# Altium PCB Stepper-Driver-v2.0.PcbDoc (part 6 of 7)
Units mil, origin at the board's own origin, x right, y up, seen from the top; angles counter-clockwise.
Board outline 5905.51 x 4330.71 mil, 4 copper layers (Top Layer, Layer 1, Layer 2, Bottom Layer), stack 62.047 mil thick; 312 components, 285 nets, 1093 pads, 969 vias.
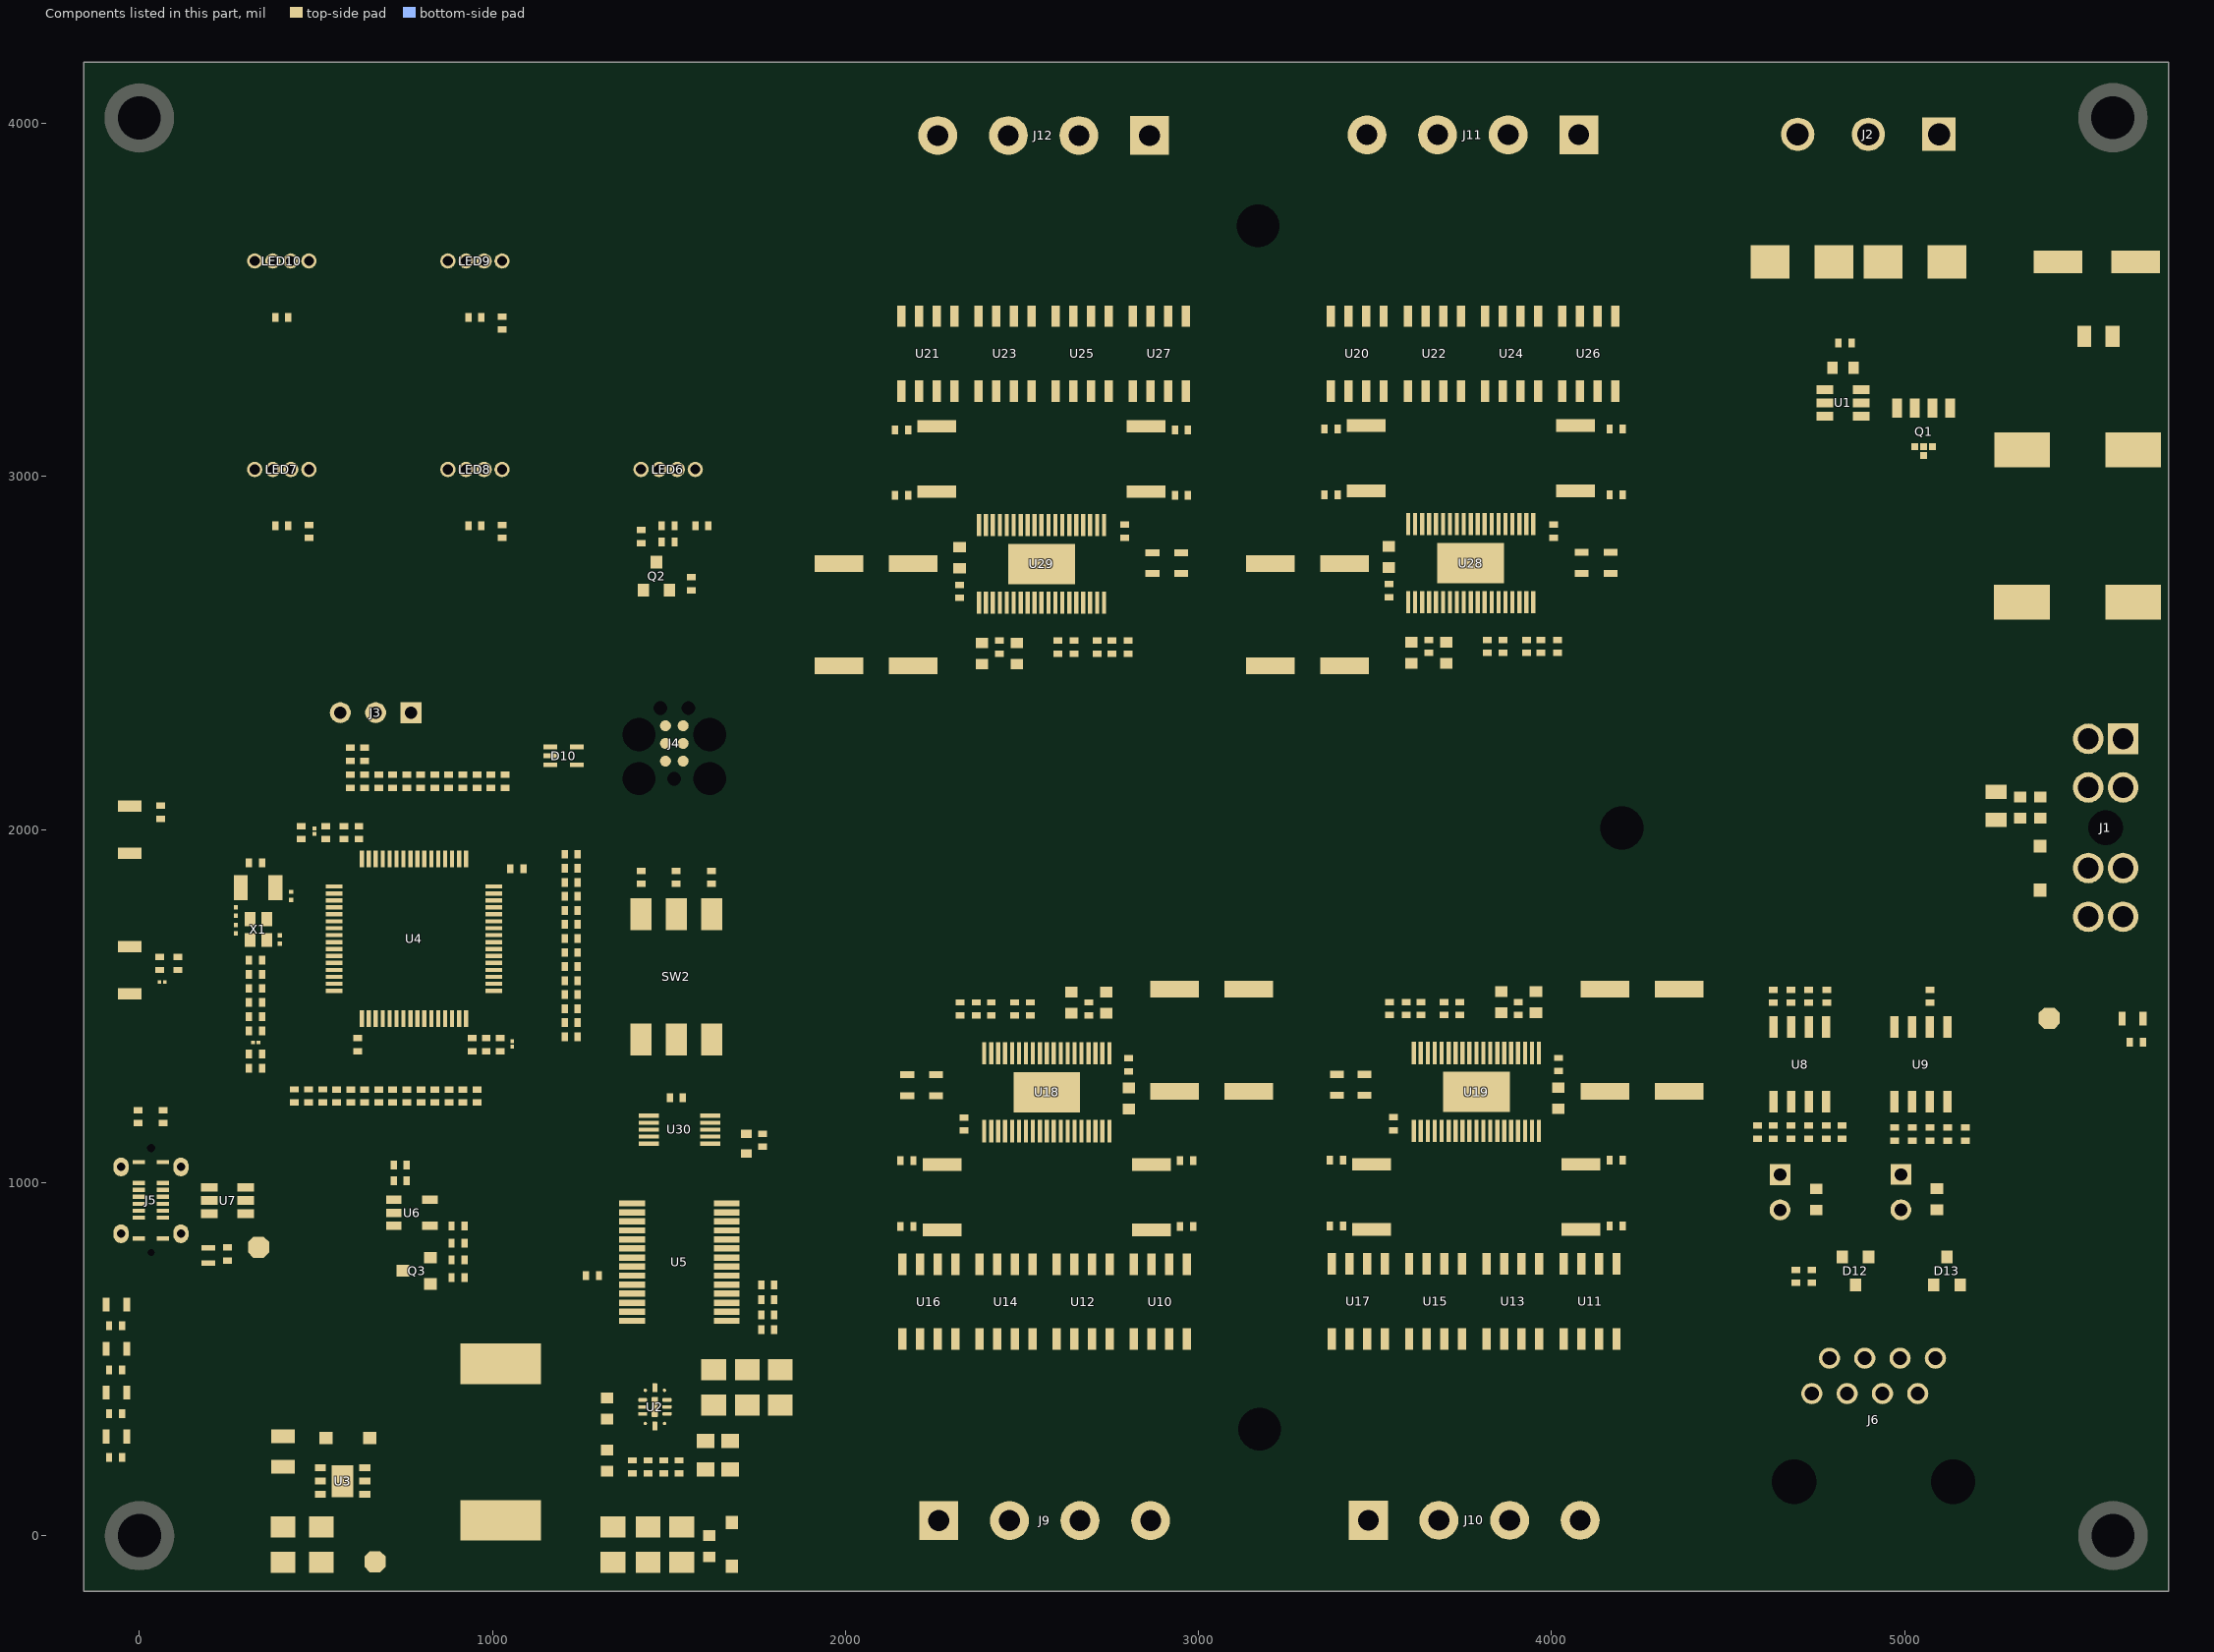
[diagram p6: the components of this part, seen from the top]

## Polygon pours and split planes (outlines as drawn) (continued)
BOUT1-4 on Top Layer "NONET_L-01_P-001" (solid, remove dead copper, pour order 67): 2623.54,3120.95 2578.36,3075.77 2578.36,2862.77 2565.69,2862.77 2565.69,3398.82 2677.5,3398.82 2677.5,3592.01 2573.56,3592.01 2573.56,4143.34 2748.9,4143.34 2748.9,3809.57 2768.35,3790.12 2768.35,3293.44 2623.54,3293.44
24V on Top Layer "24V_L01_P118" (solid, pour order 118): 3336.33,2806.39 3090.29,2806.39 3071.8,2824.87 3071.8,3394.13 3051.74,3414.19 2899.98,3414.19 2899.98,3568.53 3440.12,3568.53 3440.12,3421.14 3290.58,3421.14 3265.86,3396.43 3265.86,2919.18 3307.36,2877.68 3556.36,2877.68 3556.36,2768.24 3500.96,2768.24 3490.86,2758.14 3490.86,2600.77 3503.01,2588.62 3638.18,2588.62 3647.78,2598.21 3647.78,2640.07 3657.77,2640.07 3657.77,2584.73 3626.68,2553.64 3626.68,2511.41 3502.38,2511.41 3490.86,2499.88 3490.86,2410.07 3336.33,2410.07
AOUT1-3 on Top Layer "NONET_L-01_P-001" (solid, remove dead copper, pour order 14): 3286.39,3385.19 3301.67,3400.48 3460.45,3400.48 3460.45,3589.84 3286.39,3589.84 3286.39,4145.49 3569.43,4145.49 3569.43,3824.63 3549.09,3804.29 3549.09,3292.52 3391.93,3292.52 3391.93,3207.35 3308.39,3207.35 3308.39,2943.4 3336.64,2915.14 3617.19,2915.14 3617.19,2864.92 3609.63,2864.92 3609.63,2901.62 3322.66,2901.62 3286.39,2937.9
24V on Top Layer "24V_L01_P117" (solid, pour order 117): 4465.19,440.92 4486.17,461.91 4486.17,1182.19 4475.76,1192.6 4221.39,1192.6 4221.39,1572.24 4066.86,1572.24 4066.86,1507.43 4055.34,1495.9 3931.04,1495.9 3931.04,1458.77 3899.95,1427.68 3899.95,1367.24 3909.94,1367.24 3909.94,1409.1 3919.48,1418.64 3957.15,1418.69 4054.71,1418.69 4066.86,1406.54 4066.86,1249.17 4056.75,1239.07 4001.35,1239.07 4001.35,1131.24 4248.74,1131.24 4292.33,1087.66 4292.33,624.07 4263.87,595.61 4117.6,595.61 4117.6,440.92
BOUT2-2 on Top Layer "NONET_L-01_P-001" (solid, remove dead copper, pour order 38): 3290.35,624.05 3298.35,616.05 3464.28,616.05 3464.28,419.62 3290.35,419.62 3290.35,-133.8 3573.39,-133.8 3573.39,187.06 3553.05,207.4 3553.05,719.17 3455.56,719.17 3455.56,804.34 3399.73,804.34 3399.73,729.56 3355.71,729.56 3355.71,804.34 3312.35,804.34 3312.35,1068.29 3340.26,1096.21 3633.11,1096.21 3633.11,1146.77 3625.51,1146.77 3625.51,1110.07 3326.62,1110.07 3290.35,1073.79
AOUT1-1 on Top Layer "NONET_L-01_P-001" (solid, remove dead copper, pour order 41): 3043.07,615.06 3054.49,626.47 3054.49,1072.93 3018.91,1108.51 2731.25,1108.51 2731.25,1145.91 2723.69,1145.91 2723.69,1095.29 3004.64,1095.29 3032.49,1067.43 3032.49,804.23 2939.1,804.23 2939.1,718.79 2791.79,718.79 2791.79,206.54 2771.45,186.2 2771.45,-134.66 3054.49,-134.66 3054.49,418.64 2880,418.64 2880,615.06
AOUT1-2 on Top Layer "NONET_L-01_P-001" (solid, remove dead copper, pour order 23): 4254.2,616.08 4271.33,633.21 4271.33,1073.79 4235.06,1110.07 3948.09,1110.07 3948.09,1146.77 3940.53,1146.77 3940.53,1095.89 4221.73,1095.89 4249.33,1068.29 4249.33,804.34 4155.94,804.34 4155.94,719.17 4008.63,719.17 4008.63,207.4 3988.29,187.06 3988.29,-133.8 4271.33,-133.8 4271.33,420.07 4097.05,420.07 4097.05,616.08
GND on Top Layer "GND_L01_P125" (solid, remove dead copper, pour order 125): -137.67,-133.8 -137.67,4145.49 5728.95,4145.49 5728.95,-133.8
NetC9_1 on Top Layer "NETC9_1_L01_P103" (solid, pour order 103): 882.33,533.62 898.77,550.07 1454.3,550.07 1470.2,534.16 1470.2,406.2 1449.34,406.2 1449.34,470.05 1448.94,470.46 1341.69,470.46 1341.69,370.94 1341.69,358.68 903.71,358.68 882.33,380.07
AGND on Top Layer "AGND_L01_P121" (solid, pour order 121): 588.16,1630.92 584.54,1627.3 550.83,1627.3 550.83,1617.32 619.3,1617.32 626.57,1624.6 626.57,1717.78 623.66,1720.69 590.98,1720.69 588.16,1717.87
AGND on Top Layer "AGND_L01_P120" (solid, pour order 120): 319.25,1336.66 272.26,1336.66 272.26,1392.04 323.11,1392.04 323.11,1482.72 241.13,1482.72 233.83,1475.42 233.83,1317.97 240.14,1311.66 319.25,1311.66
24V on Top Layer "24V_L01_P119" (solid, pour order 119): 1879.64,3569.48 1855.56,3545.4 1855.56,2825.13 1874.3,2806.39 2120.35,2806.39 2120.35,2420.07 2274.87,2420.07 2274.87,2499.88 2286.4,2511.41 2410.7,2511.41 2410.7,2552.12 2441.78,2583.2 2441.78,2640.07 2431.8,2640.07 2431.8,2598.21 2423,2589.42 2286.23,2589.42 2274.87,2600.77 2274.87,2758.14 2284.98,2768.24 2340.38,2768.24 2340.38,2877.68 2098.71,2877.68 2049.33,2927.07 2049.33,3391.75 2071.52,3413.94 2224.14,3413.94 2224.14,3569.48
5V on Top Layer "5V_L01_P107" (solid, pour order 107): 882.33,-0.93 895.5,-14.11 1694.01,-14.11 1707.58,-0.54 1707.58,125.16 1694.54,138.2 897.47,138.2 882.33,123.07
GND on Top Layer "GND_L01_P105" (solid, pour order 105): 1398.93,277.31 1398.93,301.63 1372.94,301.63 1372.94,236.12 1470.19,236.12 1470.19,393.4 1449.23,393.4 1449.23,277.31
AOUT2-3 on Top Layer "NONET_L-01_P-001" (solid, remove dead copper, pour order 95): 3757.76,3400.48 3757.76,3292.08 3720.61,3292.08 3720.61,3195.14 3760.69,3195.14 3760.69,2833.42 3747.44,2833.42 3747.44,3077.44 3664.48,3160.4 3664.48,3292.52 3569.43,3292.52 3569.43,3792.26 3589.8,3812.64 3589.8,4145.49 3764.22,4145.49 3764.22,3592.01 3660.05,3592.01 3660.05,3400.48
GND_B-3 on Top Layer "GND_B-3_L01_P094" (solid, pour order 94): 4186.96,3182.07 4186.96,3080.98 3883.71,3080.98 3883.71,3272.13 3929.53,3272.13 3929.53,3182.07 3994,3182.07 3994,3272.13 4047.31,3272.13 4047.31,3182.07
GND_A-3 on Top Layer "GND_A-3_L01_P093" (solid, pour order 93): 3371.63,3182.07 3371.63,3080.98 3620.28,3080.98 3620.28,3272.13 3555.79,3272.13 3555.79,3182.07 3491.84,3182.07 3491.84,3272.13 3455.92,3272.13 3455.92,3182.07
AOUT1-4 on Top Layer "NONET_L-01_P-001" (solid, remove dead copper, pour order 68): 2070.41,3383.6 2080.24,3393.43 2245.19,3393.43 2245.19,3590.07 2070.41,3590.07 2070.41,4143.34 2353.45,4143.34 2353.45,3822.49 2333.11,3802.15 2333.11,3293.44 2185.8,3293.44 2185.8,3205.21 2092.41,3205.21 2092.41,2941.25 2120.65,2913.01 2401.2,2913.01 2401.2,2862.77 2393.65,2862.77 2393.65,2899.48 2106.68,2899.48 2070.41,2935.75
AOUT2-4 on Top Layer "NONET_L-01_P-001" (solid, remove dead copper, pour order 66): 2541.78,3398.34 2541.78,3283.7 2504.63,3283.7 2504.63,3193 2545.07,3193 2545.07,2831.28 2531.46,2831.28 2531.46,3075.29 2448.5,3158.26 2448.5,3293.44 2353.45,3293.44 2353.45,3790.12 2372.9,3809.57 2372.9,4143.34 2548.23,4143.34 2548.23,3592.01 2444.21,3592.01 2444.21,3398.34
GND_B-4 on Top Layer "GND_B-4_L01_P065" (solid, pour order 65): 2951.31,3179.07 2951.31,3078.84 2667.73,3078.84 2667.73,3272.13 2723.47,3272.13 2723.47,3200.72 2767.26,3200.72 2767.26,3272.13 2842.13,3272.13 2842.13,3179.07
GND_A-4 on Top Layer "GND_A-4_L01_P064" (solid, pour order 64): 2155.64,3179.07 2155.64,3078.84 2404.3,3078.84 2404.3,3272.33 2329.92,3272.33 2329.92,3200.72 2286.1,3200.72 2286.1,3272.33 2229.9,3272.33 2229.9,3179.07
NetC3_1 on Top Layer "NETC3_1_L01_P063" (solid, pour order 63): 5013.52,3242.07 4919.33,3242.07 4919.33,3524.07 5033.46,3524.07 5033.46,4145.49 5728.95,4145.49 5728.95,3144.84 5013.52,3144.84
VIN on Top Layer "VIN_L01_P048" (solid, pour order 48): 4944.78,3124.84 4944.78,3183.33 4840.21,3183.33 4840.21,2069.6 5728.95,2069.6 5728.95,3124.84
24V on Top Layer "24V_L01_P047" (solid, pour order 47): 3004.54,1200.07 3250.59,1200.07 3269.33,1181.33 3269.33,616.14 3289.86,595.6 3443.85,595.6 3443.85,440.07 2901.62,440.07 2900.76,439.21 2900.76,594.75 3051.74,594.75 3077.33,620.33 3077.33,1084.96 3033.52,1128.77 2784.51,1128.77 2784.51,1238.21 2839.91,1238.21 2850.02,1248.31 2850.02,1405.68 2837.87,1417.83 2740.31,1417.83 2702.64,1417.78 2693.1,1408.24 2693.1,1366.39 2683.11,1366.39 2683.11,1426.82 2714.2,1457.91 2714.2,1495.04 2838.49,1495.04 2850.02,1506.57 2850.02,1571.38 3004.54,1571.38
BOUT2-1 on Top Layer "NONET_L-01_P-001" (solid, remove dead copper, pour order 42): 2138.87,803.48 2138.87,728.7 2182.89,728.7 2182.89,803.48 2238.72,803.48 2238.72,718.34 2336.2,718.34 2336.2,206.54 2356.55,186.2 2356.55,-134.66 2073.5,-134.66 2073.5,418.37 2247.39,418.37 2247.39,615.2 2073.5,615.2 2073.5,1072.93 2109.77,1109.2 2408.67,1109.2 2408.67,1145.91 2416.27,1145.91 2416.27,1095.2 2123.27,1095.2 2095.5,1067.43 2095.5,803.48
BOUT1-1 on Top Layer "NONET_L-01_P-001" (solid, remove dead copper, pour order 40): 2501.36,887.74 2546.53,932.92 2546.53,1145.91 2559.23,1145.91 2559.23,615.14 2447.1,615.14 2447.1,418.82 2551.33,418.82 2551.33,-134.66 2376,-134.66 2376,199.12 2356.55,218.57 2356.55,718.62 2501.36,718.62
AOUT2-1 on Top Layer "NONET_L-01_P-001" (solid, remove dead copper, pour order 39): 2583.11,615.14 2583.11,719.17 2620.27,719.17 2620.27,815.69 2579.68,815.69 2579.68,1177.41 2593.43,1177.41 2593.43,933.39 2676.4,850.43 2676.4,718.79 2771.45,718.79 2771.45,218.57 2752,199.12 2752,-134.66 2576.66,-134.66 2576.66,418.82 2680.73,418.82 2680.73,615.14
GND_B-2 on Top Layer "GND_B-2_L01_P020" (solid, pour order 20): 3390.42,830.07 3390.42,930.71 3674.01,930.71 3674.01,739.56 3618.26,739.56 3618.26,808.83 3574.47,808.83 3574.47,739.56 3499.6,739.56 3499.6,830.07
BOUT1-2 on Top Layer "NONET_L-01_P-001" (solid, remove dead copper, pour order 22): 3718.2,888.6 3763.38,933.77 3763.38,1146.77 3776.92,1146.77 3776.92,616 3663.34,616 3663.34,419.67 3768.17,419.67 3768.17,-133.8 3592.84,-133.8 3592.84,199.97 3573.39,219.42 3573.39,719.17 3718.2,719.17
AOUT2-2 on Top Layer "NONET_L-01_P-001" (solid, remove dead copper, pour order 21): 3799.95,616 3799.95,719.17 3837.11,719.17 3837.11,816.54 3797.26,816.54 3797.26,1178.27 3810.27,1178.27 3810.27,934.25 3893.24,851.29 3893.24,719.17 3988.29,719.17 3988.29,219.42 3968.84,199.97 3968.84,-133.8 3793.5,-133.8 3793.5,419.67 3898.36,419.67 3898.36,616
GND_A-2 on Top Layer "GND_A-2_L01_P016" (solid, pour order 16): 4186.09,830.07 4186.09,930.71 3937.43,930.71 3937.43,739.56 4011.82,739.56 4011.82,808.83 4055.64,808.83 4055.64,739.56 4111.84,739.56 4111.84,830.07
24V on Layer 2 "24V_L03_P123" (solid, pour order 123): 1282.06,358.68 1265.33,375.41 1265.33,537.07 1279.33,551.07 1280.33,550.07 1632.33,550.07 1642.66,539.74 1642.66,370.4 1630.95,358.68
5V on Layer 2 "5V_L03_P116" (solid, pour order 116): -157.85,3710.89 -118.67,3750.07 1660.33,3750.07 1699.33,3711.07 1699.33,2911.07 1665.33,2877.07 278.33,2877.07 233.83,2832.57 233.83,165.57 256.47,142.92 1707.58,142.92 1707.58,-157.11 -157.85,-157.11
3V3 on Layer 2 "3V3_L03_P108" (solid, remove dead copper, pour order 108): 4627.95,1198.33 4808.33,1198.33 4845.26,1161.4 4845.26,1072.26 4827.79,1054.79 4801.65,1080.93 4801.65,1153.54 4791.89,1163.29 4627.95,1163.29 4627.95,1012.21 4646.95,993.21 4647.28,993.54 5292.8,993.54 5339.33,1040.07 5339.33,1870.17 5297.44,1912.07 4416.33,1912.07 4372.33,1956.07 4372.33,2826.07 4340.33,2858.07 296.33,2858.07 256.33,2818.07 256.33,186.07 277.33,165.07 795.33,165.07 819.39,189.12 819.39,620.12 849.33,650.07 1973.05,650.07 1993.52,670.53 1993.52,1136.12 2055.72,1198.33
BOUT2-3 on Layer 2 "NONET_L-01_P-001" (solid, remove dead copper, pour order 102): 4102.16,3285.84 4213.39,3285.84 4213.39,3485.64 4094.87,3485.64 4094.87,3576.62 4267.37,3576.62 4267.37,4145.49 3984.33,4145.49 3984.33,3824.63 4004.67,3804.29 4004.67,3285.84
AOUT1-3 on Layer 2 "NONET_L-01_P-001" (solid, remove dead copper, pour order 101): 3549.09,3285.84 3343.39,3285.84 3343.39,3485.64 3458.89,3485.64 3458.89,3576.62 3286.39,3576.62 3286.39,4145.49 3569.43,4145.49 3569.43,3824.63 3549.09,3804.29
BOUT1-3 on Layer 2 "NONET_L-01_P-001" (solid, remove dead copper, pour order 100): 3799.52,3285.84 3799.52,3485.64 3888.08,3485.64 3888.08,3576.62 3789.55,3576.62 3789.55,4145.49 3964.88,4145.49 3964.88,3811.71 3984.33,3792.26 3984.33,3285.84
AOUT2-3 on Layer 2 "NONET_L-01_P-001" (solid, remove dead copper, pour order 99): 3753.39,3285.84 3569.43,3285.84 3569.43,3792.26 3588.88,3811.71 3588.88,4145.49 3764.22,4145.49 3764.22,3576.62 3683.39,3576.62 3683.39,3485.64 3753.39,3485.64
BOUT2-4 on Layer 2 "NONET_L-01_P-001" (solid, remove dead copper, pour order 80): 2886.17,3283.7 2997.41,3283.7 2997.41,3483.5 2878.89,3483.5 2878.89,3574.48 3051.39,3574.48 3051.39,4143.34 2768.35,4143.34 2768.35,3822.49 2788.69,3802.15 2788.69,3283.7
AOUT1-4 on Layer 2 "NONET_L-01_P-001" (solid, remove dead copper, pour order 79): 2333.11,3283.7 2127.41,3283.7 2127.41,3483.5 2242.91,3483.5 2242.91,3574.48 2070.41,3574.48 2070.41,4143.34 2353.45,4143.34 2353.45,3822.49 2333.11,3802.15
BOUT1-4 on Layer 2 "NONET_L-01_P-001" (solid, remove dead copper, pour order 78): 2583.54,3283.7 2583.54,3483.5 2672.1,3483.5 2672.1,3574.48 2573.56,3574.48 2573.56,4143.34 2748.9,4143.34 2748.9,3809.57 2768.35,3790.12 2768.35,3283.7
AOUT2-4 on Layer 2 "NONET_L-01_P-001" (solid, remove dead copper, pour order 77): 2537.41,3283.7 2353.45,3283.7 2353.45,3790.12 2372.9,3809.57 2372.9,4143.34 2548.23,4143.34 2548.23,3574.48 2467.41,3574.48 2467.41,3483.5 2537.41,3483.5
BOUT2-1 on Layer 2 "NONET_L-01_P-001" (solid, remove dead copper, pour order 27): 2238.72,724.99 2127.49,724.99 2127.49,525.19 2246.01,525.19 2246.01,434.21 2073.5,434.21 2073.5,-134.66 2356.55,-134.66 2356.55,186.2 2336.2,206.54 2336.2,724.99
AOUT1-1 on Layer 2 "NONET_L-01_P-001" (solid, remove dead copper, pour order 26): 2791.79,724.99 2997.49,724.99 2997.49,525.19 2881.99,525.19 2881.99,434.21 3054.49,434.21 3054.49,-134.66 2771.45,-134.66 2771.45,186.2 2791.79,206.54
BOUT1-1 on Layer 2 "NONET_L-01_P-001" (solid, remove dead copper, pour order 25): 2541.36,724.99 2541.36,525.19 2452.79,525.19 2452.79,434.21 2551.33,434.21 2551.33,-134.66 2376,-134.66 2376,199.12 2356.55,218.57 2356.55,724.99
AOUT2-1 on Layer 2 "NONET_L-01_P-001" (solid, remove dead copper, pour order 24): 2587.49,724.99 2771.45,724.99 2771.45,218.57 2752,199.12 2752,-134.66 2576.66,-134.66 2576.66,434.21 2657.49,434.21 2657.49,525.19 2587.49,525.19
AOUT2-2 on Layer 2 "NONET_L-01_P-001" (solid, remove dead copper, pour order 7): 3804.33,725.85 3988.29,725.85 3988.29,219.42 3968.84,199.97 3968.84,-133.8 3793.5,-133.8 3793.5,435.07 3874.33,435.07 3874.33,526.05 3804.33,526.05
AOUT1-2 on Layer 2 "NONET_L-01_P-001" (solid, remove dead copper, pour order 12): 4008.63,725.85 4214.33,725.85 4214.33,526.05 4098.83,526.05 4098.83,435.07 4271.33,435.07 4271.33,-133.8 3988.29,-133.8 3988.29,187.06 4008.63,207.4
BOUT2-2 on Layer 2 "NONET_L-01_P-001" (solid, remove dead copper, pour order 18): 3455.56,725.85 3344.33,725.85 3344.33,526.05 3462.85,526.05 3462.85,435.07 3290.35,435.07 3290.35,-133.8 3573.39,-133.8 3573.39,187.06 3553.05,207.4 3553.05,725.85
BOUT1-2 on Layer 2 "NONET_L-01_P-001" (solid, remove dead copper, pour order 10): 3758.2,725.85 3758.2,526.05 3669.63,526.05 3669.63,435.07 3768.17,435.07 3768.17,-133.8 3592.84,-133.8 3592.84,199.97 3573.39,219.42 3573.39,725.85
SHGND on Layer 1 "SHGND_L02_P111" (solid, pour order 111): 59.52,875.65 115.11,820.07 149.51,820.07 158.33,828.88 158.33,1070.7 150.79,1078.24 111.9,1078.24 57.83,1024.17 5.22,1024.17 -50.67,1080.07 -50.67,3819.32 205.68,3819.32 205.68,4076.01 2794.1,4076.01 4612.34,4076.01 4629.33,4059.03 4629.33,3910.07 4639.33,3900.07 4749.33,3900.07 4759.33,3910.07 4759.33,4060.07 4784.33,4085.07 5393.38,4085.07 5393.38,3810.07 5664.33,3810.07 5664.33,-146.92 5747.66,-146.92 5747.66,3870.07 5747.66,4173.6 -157.85,4173.6 -157.85,-157.11 -50.67,-157.11 -50.67,820.07 4.92,875.65
AGND on Layer 1 "AGND_L02_P036" (solid, pour order 36): 278.82,1396.69 286.33,1404.2 286.33,1608.09 323.3,1645.07 619.57,1645.07 626.57,1652.07 626.57,1723.54 619.04,1731.07 202.33,1731.07 202.33,1403.66 209.3,1396.69
SHGND on Layer 1 "SHGND_L02_P122" (solid, pour order 122): 196.8,-84.93 196.8,206.79 -67.48,206.79 -157.48,296.79 -157.48,-156.75 5748.03,-156.74 5748.03,260.07 5685.13,197.17 5384.13,197.17 5384.13,-84.93
GND on Layer 1 "GND_L02_P130" (solid, pour order 130): -157.85,-157.11 -157.85,4173.6 5747.66,4173.6 5747.66,-157.11
24V on Bottom Layer "24V_L04_P045" (solid, pour order 45): 4192.45,770.07 4192.45,2022.07 5722.04,2022.07 5722.04,-134.66 1973.33,-134.66 1973.33,770.07
24V on Bottom Layer "24V_L04_P046" (solid, pour order 46): 4192.45,3226.46 4192.45,1748.07 4947.33,1748.07 4947.33,4145.49 1974.19,4145.49 1974.19,3226.46
GND on Bottom Layer "GND_L04_P109" (solid, pour order 109): 1929.33,3182.07 1931.62,3184.36 1931.62,4145.49 -130.67,4145.49 -130.67,-134.66 1931.62,-134.66 1931.62,830.07 4141.33,830.07 4141.33,3182.07
NetC3_1 on Bottom Layer "NETC3_1_L04_P001" (solid, pour order 1): 4987.33,3168.01 4987.33,4145.49 5722.04,4145.49 5722.04,3168.01
VIN on Bottom Layer "VIN_L04_P002" (solid, pour order 2): 4987.33,3124.84 4987.33,2069.6 5722.04,2069.6 5722.04,3124.84

## Other copper
Top Layer:
  rectangle net GND: 5109.63,1151.18 5133.11,1176.85
  rectangle net NetQ2_3: 1408.31,2738.97 1487.71,2827.48
  rectangle net 5V: 1506.71,2802.48 1524.71,2872.78
  region net GND: 4872.17,710.78 4848.8,710.78 4848.8,679.92 4872.17,679.92
  rectangle net BEMF-4: 2726.16,2809.62 2759.33,2862.77
  rectangle net GND: 1591.22,379.3 1672.58,417.56
  rectangle net NetC20_2: 371.17,-5.12 441.17,214.54
  rectangle net USB_FS_OVCR: 698.49,820.54 789.28,889.1
  rectangle net GND: 625.49,238.16 678.82,294.32
  rectangle net 3V3: -59.33,561.65 10.15,623.07
  rectangle net 3V3: -58.63,437.62 -11.68,495.87
  rectangle net 3V3: -58.63,313.71 -11.68,371.96
  region net NetLED5_2: -35.86,540.71 -35.86,517 -11.68,517 -11.68,540.71
  rectangle net NetLED4_1: -107.08,582.3 -77.21,674.48
  rectangle net NRST_MCU: 44.03,1563.43 59.32,1611.37
  rectangle net VBAT: 445.74,1963.66 545.59,1990.32
  rectangle net GND: 266.93,1667.75 328.85,1712.06
  rectangle net PC15-OSC32_OUT: 266.93,1794.54 306.3,1870.54
  rectangle net AGND: 256.33,1324.16 319.25,1337.09
  rectangle net AGND: 268.51,1391.99 315.85,1404.2
  rectangle net AGND: 272.26,1462.47 323.11,1482.72
  rectangle net AVDD: 334.39,1351.84 376.16,1366.94
  rectangle net 3V3: 3529.47,1511.38 3553.18,1532.04
  region net 3V3: 3940.86,2511.37 3915.86,2511.37 3915.86,2491.29 3940.86,2491.29
  rectangle net SPI1_MISO: 3915.86,2526.21 3940.86,2546.29
  region net NetLED15_2: 4028.93,2511.37 4003.93,2511.37 4003.93,2491.29 4028.93,2491.29
  rectangle net DI_PA7: 4003.93,2526.21 4028.93,2546.29
  region net NetLED17_2: 4186.69,2738.31 4147.32,2738.31 4147.32,2714.07 4186.69,2714.07
  region net NetLED15_2: 4104.38,2738.31 4065.01,2738.31 4065.01,2714.07 4104.38,2714.07
  rectangle net 3V3: 4071.99,2784.21 4095.7,2804.87
  rectangle net GND: 3817.87,2491.28 3875.15,2509.28
  rectangle net 3V3: 4154.31,2784.21 4178.01,2804.87
  region net NetLED16_2: 2812.95,2509.22 2787.95,2509.22 2787.95,2489.14 2812.95,2489.14
  rectangle net DI_PB10: 2787.95,2524.06 2812.95,2544.14
  rectangle net DI_PB10: 2788.74,2530.66 2812.45,2551.33
  rectangle net SPI1_MISO: 2699.88,2524.06 2724.88,2544.14
  rectangle net SPI1_MISO: 2700.67,2530.66 2724.38,2551.33
  region net GND: 2613.73,2498.19 2590.02,2498.19 2590.02,2477.52 2613.73,2477.52
  region net GND: 3325.5,1571.38 3026.81,1571.38 3026.81,1225.99 3325.5,1225.99
  rectangle net NetR1_1: 4749.62,3158.92 4810.22,3183.33
  rectangle net VIN: 4840.21,3148.53 4945.17,3183.33
  rectangle net 24V: 1533.76,378.31 1574.33,534.16
  rectangle net NetC9_1: 1282.06,358.68 1341.69,476.55
  rectangle net 24V: 1357.97,378.31 1385.73,449.78
  region net 24V: 2657.16,3569.48 2464.87,3569.48 2464.87,3419 2657.16,3419
  rectangle net GND: 3371.63,2935.9 3577.39,3038.37
  rectangle net GND: 1732.27,227.84 1879.9,400.1
  rectangle net GND: 251.33,1750.34 278.74,1762.15
  region net GND: 317.09,1699.08 286.99,1699.08 286.99,1675.82 317.09,1675.82
  rectangle net GND: 423.3,1819.08 435.11,1844.7
  rectangle net 3V3: 979.96,1832.89 1059.27,1901.63
  region net GND: 720.15,902.83 720.15,926.53 683.66,926.53 683.66,902.83
  region net 3V3: 920.83,840.39 920.83,816.69 945.01,816.69 945.01,840.39
  region net GND: 920.83,742.79 920.83,719.08 945.01,719.08 945.01,742.79
  region net GND: 836.15,713.07 812.44,713.07 812.44,688.88 836.15,688.88
  region net GND: 261.54,779.07 237.83,779.07 237.83,754.88 261.54,754.88
  region net GND: 206.54,771.92 182.83,771.92 182.83,755.61 206.54,755.61
  region net GND: -35.86,292.78 -35.86,269.07 -11.68,269.07 -11.68,292.78
  region net GND: -35.86,416.89 -35.86,393.19 -11.68,393.19 -11.68,416.89
  rectangle net GND: -18.78,1052.27 83.58,1064.08
  rectangle net GND: -18.78,835.74 83.58,847.55
  region net GND: 300.9,937.61 300.9,961.31 269.15,961.31 269.15,937.61
  rectangle net GND: -15.38,1201.09 8.33,1221.75
  rectangle net GND: 54.75,1201.09 78.45,1221.75
  region net GND: 630.04,1377.14 606.34,1377.14 606.34,1356.48 630.04,1356.48
  region net GND: 342.77,1335.87 342.77,1312.16 363.44,1312.16 363.44,1335.87
  region net GND: 993.62,1372.66 970.26,1372.66 970.26,1325.16 993.62,1325.16
  region net GND: 1033.48,1372.66 1010.12,1372.66 1010.12,1325.16 1033.48,1325.16
  rectangle net GND: 1364.74,1360.83 1650.48,1450.83
  rectangle net 3V3: 626.16,2231.81 649.51,2249.31
  rectangle net 3V3: 585.99,2231.81 609.35,2249.31
  rectangle net 3V3: 446.55,2009.66 469.91,2027.16
  rectangle net GND: 515.52,2009.66 538.88,2027.16
  rectangle net GND: 609.79,2009.66 633.14,2027.16
  rectangle net GND: 566.79,2009.66 590.15,2027.16
  rectangle net GND: 1788.83,570.95 1879.33,680.68
  rectangle net GND: 629.47,249.67 674.47,294.32
  rectangle net GND: 256.47,-104.93 441.17,-45.12
  rectangle net GND: 256.47,-104.93 354.33,5.6
  rectangle net GND: 544.53,182.42 653.79,202.1
  rectangle net GND: 1209.33,159.6 1341.69,197.84
  rectangle net GND: 1209.33,159.6 1291.83,236.12
  rectangle net GND: 1147.56,-105.54 1695.62,-45.12
  region net GND: 4544.37,1571.38 4246.19,1571.38 4246.19,1215.07 4544.37,1215.07
  rectangle net GND: 5566.16,1444.62 5625.7,1483.99
  rectangle net GND: 4474.33,3560.67 4673.94,3655.16
  rectangle net GND: 4722.01,3196.32 4810.22,3220.73
  rectangle net GND: 5568.13,2594.62 5728.95,3642.13
  region net GND: -45.67,1656.7 -45.67,1680.41 -66.33,1680.41 -66.33,1656.7
  rectangle net GND: 1797.37,2420.07 2086.15,2776.54
  rectangle net GND: 3019.33,2410.07 3301.55,2776.96
  rectangle net 5V: 478.33,-5.12 653.79,85.07
  rectangle net 5V: 476.33,-5.12 527.8,127.3
  rectangle net NetLED5_1: -107.08,456.68 -77.21,548.86
  rectangle net NetLED3_1: -107.08,332.77 -77.21,424.95
  rectangle net NetLED2_1: -107.08,208.57 -77.21,300.75
  region net SPI1_SCK: 314.82,1617.98 314.82,1641.68 294.16,1641.68 294.16,1617.98
  region net SPI1_NSS: 314.82,1578.21 314.82,1601.92 294.16,1601.92 294.16,1578.21
  region net 3V3: 314.73,1352.63 314.73,1376.33 294.07,1376.33 294.07,1352.63
  rectangle net AGND: 301.12,1392.04 323.11,1482.72
  rectangle net 3V3: 372.67,238.16 605.56,450.07
  rectangle net 3V3: 924.84,1441.16 1014.3,1488.4
  rectangle net 3V3: 969.43,1400.66 1060.46,1488.4
  region net 3V3: 4789.79,1124.28 4766.08,1124.28 4766.08,1103.61 4789.79,1103.61
  region net 3V3: 2336.99,1519.54 2286.26,1519.54 2286.26,1499.46 2336.99,1499.46
  region net 3V3: 2303.51,1260.94 2236.15,1260.94 2236.15,1231.37 2303.51,1231.37
  region net 3V3: 3489.36,1258.81 3449.99,1258.81 3449.99,1234.57 3489.36,1234.57
  region net 3V3: 3481.52,1244.46 3457.81,1244.46 3457.81,1223.8 3481.52,1223.8
  region net 3V3: 3403.41,1247.48 3379.71,1247.48 3379.71,1226.82 3403.41,1226.82
  region net 3V3: 3481.52,1247.48 3457.81,1247.48 3457.81,1226.82 3481.52,1226.82
  region net 24V: 1561.51,394.9 1481.4,394.9 1481.4,378.31 1561.51,378.31
  rectangle net GND: 1395.73,405.22 1439.07,449.78
  region net GND: 1523.6,449.79 1480.41,449.79 1480.41,405.22 1523.6,405.22
  rectangle net 24V: 1357.97,378.31 1438.09,394.9
  rectangle net NetC9_2: 1306.69,334.97 1438.09,347.5
  rectangle net NetC9_1: 903.71,358.68 1438.09,370.94
  rectangle net 24V: 1549.66,439.21 2222.69,538.08
  rectangle net GND: 1449.23,268.28 1470.19,393.4
  rectangle net NetC9_1: 1449.33,406.2 1470.2,470.07
  rectangle net GND: 4680.11,753.21 4703.82,773.87
  rectangle net GND: 4725.11,753.21 4748.82,773.87
  rectangle net GND: 5107.49,789.39 5131.2,820.26
  region net GND: 5182.87,1124.27 5159.38,1124.27 5159.38,1098.61 5182.87,1098.61
  region net GND: 4639.79,1124.28 4616.08,1124.28 4616.08,1103.61 4639.79,1103.61
  rectangle net 485_DIN_1: 4959.44,1461.39 4983.06,1482.06
  rectangle net 485_ROUT_1: 5109.44,1461.39 5133.06,1482.06
  region net DO_PB1: 5083.04,1509.23 5059.34,1509.23 5059.34,1488.57 5083.04,1488.57
  region net CAN1_SHDN: 4594.75,1124.23 4571.04,1124.23 4571.04,1103.57 4594.75,1103.57
  rectangle net CAN1_TXD: 4767.15,1546.23 4790.86,1566.9
  rectangle net CAN1_RXD: 4616.15,1546.23 4639.86,1566.9
  rectangle net 3V3: 5109.44,1248.8 5133.06,1269.46
  rectangle net GND: 4959.44,1248.8 4983.06,1269.46
  region net 3V3: 4689.76,1421.48 4666.14,1421.48 4666.14,1400.82 4689.76,1400.82
  region net GND: 4739.76,1478.42 4716.14,1478.42 4716.14,1421.48 4739.76,1421.48
  rectangle net GND: 4716.11,1546.19 4739.82,1566.85
  rectangle net GND: 4665.61,1546.18 4689.32,1566.85
  rectangle net VBAT: 490.16,1972.66 500.4,1987.77
  rectangle net SWO: 784.78,2150.83 808.49,2171.49
  rectangle net NetJ4_3: 96.62,1634.89 120.06,1655.55
  rectangle net NRST_MCU: 44.03,1593.37 114.83,1611.37
  rectangle net ADC_SDA: 625.6,2150.83 649.31,2171.5
  rectangle net ADC_SCL: 585.84,2150.83 609.54,2171.5
  region net DI_PB14: 1236.88,1504.45 1236.88,1480.74 1257.54,1480.74 1257.54,1504.45
  rectangle net DI_PB14: 2742.31,2530.66 2766.01,2551.33
  region net DI_PB10: 967.65,1231.49 943.94,1231.49 943.94,1193.83 967.65,1193.83
  region net LED: 848.36,1231.49 824.65,1231.49 824.65,1210.83 848.36,1210.83
  rectangle net GND: 2601.89,2489.14 2659.17,2507.14
  rectangle net DIR-1: 665.36,2150.83 689.07,2171.5
  rectangle net DO_PC10: 943.84,2150.83 967.54,2171.5
  region net SPI1_MOSI: 314.82,1498.69 314.82,1522.39 294.16,1522.39 294.16,1498.69
  region net SPI1_MISO: 314.82,1538.45 314.82,1562.16 294.16,1562.16 294.16,1538.45
  region net SPI1_MISO: 2336.15,1478.02 2312.45,1478.02 2312.45,1457.36 2336.15,1457.36
  region net DI_PA6: 3599.43,1478.88 3575.72,1478.88 3575.72,1458.22 3599.43,1458.22
  region net DI_PA5: 3641.22,1478.88 3617.51,1478.88 3617.51,1458.22 3641.22,1458.22
  region net DI_PA3: 2425.16,1484.62 2400.16,1484.62 2400.16,1473.47 2425.16,1473.47
  region net DI_PA3: 2424.37,1478.02 2400.67,1478.02 2400.67,1457.36 2424.37,1457.36
  region net DI_PA4: 2382.59,1478.02 2358.88,1478.02 2358.88,1457.36 2382.59,1457.36
  region net GND: 1797.83,679.97 1797.83,656.27 1818.49,656.27 1818.49,679.97
  region net 3V3: 1797.83,722.33 1797.83,698.63 1818.49,698.63 1818.49,722.33
  region net GND: 1264.33,724.88 1264.33,748.59 1243.67,748.59 1243.67,724.88
  rectangle net DI_PA8: 3957.5,2526.21 3982.5,2546.29
  region net NetLED17_2: 3982.5,2511.37 3957.5,2511.37 3957.5,2491.29 3982.5,2491.29
  region net GND: 3865.38,2811.77 3652.77,2811.77 3652.77,2697.59 3865.38,2697.59
  region net GND: 4186.96,3038.37 3964.39,3038.37 3964.39,2935.9 4186.96,2935.9
  region net GND: 4017.79,2826.42 3994.09,2826.42 3994.09,2805.75 4017.79,2805.75
  region net GND: 3613.98,2470.79 3590.28,2470.79 3590.28,2450.12 3613.98,2450.12
  region net GND: 3712.8,2470.82 3689.1,2470.82 3689.1,2450.16 3712.8,2450.16
  region net GND: 3663.61,2500.32 3639.91,2500.32 3639.91,2479.66 3663.61,2479.66
  region net GND: 3829.71,2500.33 3806,2500.33 3806,2479.66 3829.71,2479.66
  region net GND_B-3: 4186.96,3169.19 4122.41,3169.19 4122.41,3080.98 4186.96,3080.98
  rectangle net 24V: 4118.19,3420.89 4267.6,3561.92
  region net 24V: 3873.14,3571.62 3680.85,3571.62 3680.85,3421.14 3873.14,3421.14
  region net B1LS-3: 3973.14,3241.62 3949.52,3241.62 3949.52,3203.92 3973.14,3203.92
  region net A1LS-3: 3535.8,3241.62 3512.18,3241.62 3512.18,3203.92 3535.8,3203.92
  region net A1HS-3: 3435.8,3241.62 3412.18,3241.62 3412.18,3203.92 3435.8,3203.92
  rectangle net GND_A-3: 3371.63,3080.98 3425,3170.9
  rectangle net GND_A-4: 2155.64,3078.84 2209.01,3168.76
  region net 24V: 2224.14,3569.48 2070.41,3569.48 2070.41,3413.94 2224.14,3413.94
  region net GND_B-4: 2951.31,3167.05 2906.43,3167.05 2906.43,3078.84 2951.31,3078.84
  rectangle net GND: 2155.1,2933.75 2361.4,3036.23
  region net GND: 2447.63,2498.18 2423.93,2498.18 2423.93,2477.52 2447.63,2477.52
  region net GND: 2398,2468.64 2374.29,2468.64 2374.29,2447.98 2398,2447.98
  rectangle net 3V3: 2857.22,2782.06 2880.92,2802.73
  rectangle net 3V3: 2938.32,2782.06 2962.03,2802.73
  region net GND: 2801.81,2824.27 2778.11,2824.27 2778.11,2803.61 2801.81,2803.61
  region net GND: 2954.71,3036.23 2748.41,3036.23 2748.41,2933.75 2954.71,2933.75
  rectangle net 3V3: 2930.48,2767.71 2969.85,2791.95
  region net NetLED16_2: 2888.74,2737.45 2849.37,2737.45 2849.37,2713.21 2888.74,2713.21
  region net NetLED18_2: 2969.85,2737.45 2930.48,2737.45 2930.48,2713.21 2969.85,2713.21
  region net GND: 2649.39,2809.62 2436.79,2809.62 2436.79,2695.45 2649.39,2695.45
  region net NetLED18_2: 2766.52,2509.22 2741.52,2509.22 2741.52,2489.14 2766.52,2489.14
  region net 3V3: 2724.73,2509.22 2699.73,2509.22 2699.73,2489.14 2724.73,2489.14
  rectangle net DI_PB14: 2741.52,2524.06 2766.52,2544.14
  region net DI_PA4: 2383.38,1484.62 2358.38,1484.62 2358.38,1464.54 2383.38,1464.54
  rectangle net NetLED11_2: 2400.16,1499.46 2425.16,1519.54
  rectangle net NetLED13_2: 2358.38,1499.46 2383.38,1519.54
  region net DI_PA6: 3600.22,1485.48 3575.22,1485.48 3575.22,1465.4 3600.22,1465.4
  region net DI_PA5: 3642.01,1485.48 3617.01,1485.48 3617.01,1474.33 3642.01,1474.33
  rectangle net NetLED12_2: 3617.01,1500.32 3642.01,1520.4
  rectangle net NetLED14_2: 3575.22,1500.32 3600.22,1520.4
  rectangle net GND: 3692.34,1199.92 3904.95,1314.1
  rectangle net GND: 2475.5,1199.06 2688.1,1313.24
  rectangle net NetLED12_2: 3371.89,1292.1 3411.26,1316.34
  rectangle net NetLED14_2: 3449.99,1292.1 3489.36,1316.34
  region net 3V3: 3411.26,1261.84 3371.89,1261.84 3371.89,1237.6 3411.26,1237.6
  region net 3V3: 2194.46,1261.02 2155.09,1261.02 2155.09,1236.78 2194.46,1236.78
  region net 3V3: 2275.56,1261.02 2236.19,1261.02 2236.19,1236.78 2275.56,1236.78
  rectangle net NetLED13_2: 2236.19,1291.28 2275.56,1315.52
  rectangle net NetLED11_2: 2155.09,1291.28 2194.46,1315.52
  rectangle net GND: 2677.26,1510.51 2700.97,1531.17
  rectangle net GND: 2511.21,1510.54 2534.92,1531.21
  rectangle net GND: 2323.08,1184.41 2346.79,1205.08
  region net 3V3: 2267.68,1246.62 2243.97,1246.62 2243.97,1225.96 2267.68,1225.96
  region net 3V3: 2186.57,1246.62 2162.86,1246.62 2162.86,1225.96 2186.57,1225.96
  region net GND: 2969.79,1074.93 2763.49,1074.93 2763.49,972.45 2969.79,972.45
  rectangle net GND: 2170.19,972.45 2376.49,1074.93
  rectangle net GND_B-1: 2173.58,841.64 2218.46,929.85
  region net GND_A-1: 2969.25,929.85 2915.88,929.85 2915.88,839.93 2969.25,839.93
  region net BISENN-2: 3371.92,1074.73 3351.76,1074.73 3351.76,1051.9 3371.92,1051.9
  rectangle net GND: 3387.03,973.31 3593.33,1075.79
  rectangle net 24V: 2467.74,439.21 2660.28,594.75
  region net 24V: 2227.01,594.75 2073.5,594.75 2073.5,439.21 2227.01,439.21
  rectangle net 24V: 2900.76,439.21 3054.49,594.75
  rectangle net GND: 3539.92,1185.27 3563.63,1205.94
  rectangle net GND: 3943.74,1540.9 3967.44,1561.57
  rectangle net GND: 3844.92,1540.87 3868.62,1561.53
  rectangle net GND: 3894.1,1511.36 3917.81,1532.03
  rectangle net GND: 3728.01,1511.36 3751.72,1532.02
  rectangle net GND: 3683.23,1511.36 3706.93,1532.02
  region net GND: 4186.63,1075.79 3980.33,1075.79 3980.33,973.31 4186.63,973.31
  rectangle net GND_B-2: 3390.42,842.5 3435.3,930.71
  rectangle net 24V: 4117.6,440.07 4271.33,595.6
  region net 24V: 3443.85,595.6 3290.12,595.6 3290.12,440.07 3443.85,440.07
  rectangle net 24V: 3684.58,440.07 3876.87,595.6
  region net GND_A-2: 4186.09,930.71 4132.72,930.71 4132.72,840.78 4186.09,840.78
  rectangle net VIN: 4852.77,3123.47 4945.17,3183.33
  rectangle net NetQ1_4: 4840.21,3193.78 4992.94,3220.73
  rectangle net NetD1_1: 4799.92,3571.82 4938.69,3641.99
  region net NetC8_1: 4810.22,3326.02 4749.62,3326.02 4749.62,3233.72 4810.22,3233.72
  rectangle net NetC3_1: 4840.21,3233.72 5209.33,3524.07
  rectangle net 3V3: 605.83,1399.06 673.34,1430.23
  rectangle net AVDD: 334.39,1351.84 356.25,1482.72
  rectangle net PC14-OSC32_IN: 365.35,1794.54 404.72,1870.54
  rectangle net 3V3: 565.98,1893.91 590.98,1981.66
  rectangle net 3V3: 584.58,1893.91 629.57,1941.16
  pour cut-out: 3037.6,301.58 cw(c3172.59,301.58) 3172.59,436.57 cw(c3172.59,301.58) 3307.58,301.58 cw(c3172.59,301.58) 3172.59,166.59 cw(c3172.59,301.58)
  pour cut-out: 3033.64,3710.11 ccw(c3168.63,3710.11) 3168.63,3575.12 ccw(c3168.63,3710.11) 3303.62,3710.11 ccw(c3168.63,3710.11) 3168.63,3845.1 ccw(c3168.63,3710.11)
  pour cut-out: 4081.22,2004.29 ccw(c4199.33,2004.29) 4199.33,1886.18 ccw(c4199.33,2004.29) 4317.44,2004.29 ccw(c4199.33,2004.29) 4199.33,2122.4 ccw(c4199.33,2004.29)
  region net SHGND: 5747.66,3951.1 5747.66,4173.6 5746.93,4174.33 5524.43,4174.33 ccw(c5589.82,4016.48) 5418.96,4016.48 ccw(c5589.82,4016.48) 5589.82,3845.63 ccw(c5589.82,4016.48)
  region net SHGND: 64.65,4173.6 -157.85,4173.6 -158.58,4172.86 -158.58,3950.37 ccw(c-0.74,4015.75) -0.74,3844.89 ccw(c-0.74,4015.75) 170.12,4015.75 ccw(c-0.74,4015.75)
  region net SHGND: -157.85,65.38 -157.85,-157.11 -157.11,-157.85 65.38,-157.85 ccw(c0,0) 170.85,0 ccw(c0,0) 0,170.85 ccw(c0,0)
  region net SHGND: 5524.8,-157.48 5747.3,-157.48 5748.03,-156.74 5748.03,65.75 ccw(c5590.18,0.37) 5590.18,171.22 ccw(c5590.18,0.37) 5419.33,0.37 ccw(c5590.18,0.37)
  pour cut-out: 4544.37,850.07 4611.95,850.07 4611.95,300.07 5209.33,300.07 5209.33,1630.07 4544.38,1630.07
  pour cut-out: 178.32,2640.07 178.34,3732.07 1673.33,3732.07 1673.33,2640.07
  pour cut-out: 1606.54,1575.69 1702.71,1671.86 1702.71,1715.16 1702.72,2428.86 1163.67,2428.86 1163.67,2200.36 1238.73,2200.36 1238.73,1933.08 1163.66,1933.08 1163.66,1575.69
  pour cut-out: 4678.39,3133.64 4678.39,3403.21 4838.52,3403.21 4838.52,3133.64
  pour cut-out: 4709.37,3524.07 4709.37,3685.07 5033.46,3685.07 5033.46,3524.07
  region net VBAT: 498.86,1835.33 498.86,1841.66 536.66,1841.66 536.66,1832.89 501.3,1832.89
  pour cut-out: 2288.28,2498.14 2502.47,2498.14 2502.47,2483.64 2288.28,2483.64
  pour cut-out: 3504.26,2500.28 3718.46,2500.28 3718.46,2485.78 3504.26,2485.78
  pour cut-out: 2836.57,1510.51 2622.38,1510.51 2622.38,1525 2836.57,1525
  pour cut-out: 4053.45,1511.41 3839.26,1511.41 3839.26,1525.9 4053.45,1525.9
  pour cut-out: 5548.59,2557.07 5548.59,3664.26 5747.66,3664.26 5747.66,2557.07
  text "1" at 336.37,3974.42 h50
Layer 1:
  pour cut-out: 5372.99,3648.17 5372.99,3789.26 5645.24,3789.26 5645.24,3648.17
  pour cut-out: 5019.33,3648.17 5019.33,4064.67 5372.99,4064.67 5372.99,3648.17
  text "2" at 412.04,3974.42 h50
Layer 2:
  text "3" at 529.36,3974.42 h50
Bottom Layer:
  region net SHGND: 64.65,4173.6 -157.85,4173.6 -158.58,4172.86 -158.58,3950.37 ccw(c-0.74,4015.75) -0.74,3844.89 ccw(c-0.74,4015.75) 170.12,4015.75 ccw(c-0.74,4015.75)
  region net SHGND: -157.85,65.38 -157.85,-157.11 -157.11,-157.85 65.38,-157.85 ccw(c0,0) 170.85,0 ccw(c0,0) 0,170.85 ccw(c0,0)
  region net SHGND: 5747.66,3951.1 5747.66,4173.6 5746.93,4174.33 5524.43,4174.33 ccw(c5589.82,4016.48) 5418.96,4016.48 ccw(c5589.82,4016.48) 5589.82,3845.63 ccw(c5589.82,4016.48)
  region net SHGND: 5524.8,-157.48 5747.3,-157.48 5748.03,-156.74 5748.03,65.75 ccw(c5590.18,0.37) 5590.18,171.22 ccw(c5590.18,0.37) 5419.33,0.37 ccw(c5590.18,0.37)
  pour cut-out: 3089.99,301.58 ccw(c3172.59,301.58) 3172.59,218.98 ccw(c3172.59,301.58) 3255.18,301.58 ccw(c3172.59,301.58) 3172.59,384.17 ccw(c3172.59,301.58)
  pour cut-out: 3086.03,3710.11 ccw(c3168.63,3710.11) 3168.63,3627.51 ccw(c3168.63,3710.11) 3251.23,3710.11 ccw(c3168.63,3710.11) 3168.63,3792.71 ccw(c3168.63,3710.11)
  region net GND: 4798.82,3969.34 ccw(c4896.96,3969.34) 4896.96,3871.2 ccw(c4896.96,3969.34) 4995.1,3969.34 ccw(c4896.96,3969.34) 4896.96,4067.47 ccw(c4896.96,3969.34)
  pour cut-out: 4081.22,2005.07 ccw(c4199.33,2005.07) 4199.33,1886.96 ccw(c4199.33,2005.07) 4317.44,2005.07 ccw(c4199.33,2005.07) 4199.33,2123.18 ccw(c4199.33,2005.07)
  text "4" at 612.36,3974.42 h50
Multi-Layer:
  pour cut-out: 302.71,3949.16 302.72,4049.41 637.36,4049.41 637.36,3949.16
  pour cut-out: 302.71,3949.16 302.71,4049.41 637.36,4049.41 637.36,3949.16

## Silkscreen, mask and mechanical layers (free items; w line width, h text height)
Top Overlay:
  lines w5: 4566.8,692.73 4665.97,692.73 ; 4665.97,692.73 4762.32,692.73 4762.32,778.21 4665.97,778.21 4665.97,692.73 ; 4430,671.98 4566.8,671.98 4566.8,810 4430,810 4430,671.98
  lines w7.5: 259.68,730.07 259.68,691.22 270.83,680.07 308.26,680.07 ; 1544.33,2804.17 1679.33,2804.17 ; 1724.33,-88.08 1822.83,-88.08 ; 1869.33,392.84 1904.33,392.84 ; 4566.95,1038.77 4566.95,1088.14 ; 5141.32,1952.16 5141.32,2037.11 5207.52,2037.11 ; 5214.32,1141.91 5278.19,1141.91 ; 154.33,730.07 284.33,730.07 284.33,856.68 154.33,856.68 154.33,730.07 ; 309.33,590.07 449.33,590.07 449.33,730.07 309.33,730.07 309.33,590.07 ; 1290.59,150.07 1290.59,275.07 1554.33,275.07 1554.33,308.04 1716.73,308.04 1716.73,150.07 1290.59,150.07 ; 1292.38,-124.93 1724.33,-124.93 1724.33,95.07 1292.38,95.07 1292.38,-124.93 ; 1449.33,2788.1 1544.33,2788.1 1544.33,2889.72 1449.33,2889.72 1449.33,2788.1 ; 1574.33,325.07 1869.33,325.07 1869.33,515.07 1574.33,515.07 1574.33,325.07 ; 1679.33,2689.72 1829.33,2689.72 1829.33,2824.72 1679.33,2824.72 1679.33,2689.72 ; 1734.33,150.07 2154.33,150.07 2154.33,308.04 1734.33,308.04 1734.33,150.07 ; 1823.66,-124.31 2154.33,-124.31 2154.33,20.07 1823.66,20.07 1823.66,-124.31 ; 1904.33,325.07 2103.27,325.07 2103.27,460.07 1904.33,460.07 1904.33,325.07 ; 4190.48,900.96 4578.1,900.96 4578.1,1038.77 4190.48,1038.77 4190.48,900.96 ; 4554.33,1088.14 4854.33,1088.14 4854.33,1185.07 4554.33,1185.07 4554.33,1088.14 ; 4937,1088.14 5204.49,1088.14 5204.49,1185.07 4937,1185.07 4937,1088.14 ; 5050.48,1842.09 5256.48,1842.09 5256.48,1949.17 5050.48,1949.17 5050.48,1842.09 ; 5209.33,1984.07 5420.33,1984.07 5420.33,2147.35 5209.33,2147.35 5209.33,1984.07 ; 5281.32,1008 5624,1008 5624,1188.47 5281.32,1188.47 5281.32,1008
  text "Canagey 1.0" at 741.52,3949.26 h200
  text "+24V" at 5188.51,3759.75 h78.74 r180
  text "A1" at 2315.92,3759.1 h78.74 r180
  text "A2" at 2519.6,3759.1 h78.74 r180
  text "B1" at 2713.91,3759.1 h78.74 r180
  text "B2" at 2917.6,3759.1 h78.74 r180
  text "A1" at 3531.9,3759.1 h78.74 r180
  text "A2" at 3735.58,3759.1 h78.74 r180
  text "B1" at 3929.9,3759.1 h78.74 r180
  text "B2" at 4133.58,3759.1 h78.74 r180
  text "SGND" at 4773.2,3747.1 h78.74 r180
  text "GND" at 4962.72,3747.1 h78.74 r180
  text "MOTOR 4" at 250.79,3743 h78.74
  text "MOTOR 3" at 798.03,3743 h78.74
  text "STEPPER DRIVER - 4" at 2979.49,3674.33 h100 r180
  text "STEPPER DRIVER - 3" at 4195.48,3674.33 h100 r180
  text "POWER IN" at 5196.96,3516.89 h100 r180
  text "MOTOR 1" at 250.79,3152.45 h78.74
  text "MOTOR 2" at 798.03,3152.45 h78.74
  text "CAN IN" at 1381.21,3152.65 h78.74
  text "STALL" at 4191.74,2504.28 h60 r90
  text "STALL" at 2974.9,2503.11 h60 r90
  text "FAULT" at 4109.79,2501.28 h60 r90
  text "FAULT" at 2894.47,2500.11 h60 r90
  text "UART" at 519.75,2455.49 h78.74
  text "GND" at 526.75,2404.86 h60
  text "RX" at 658.26,2404.86 h60
  text "TX" at 749.87,2404.86 h60
  text "TAG" at 1364.89,2397.44 h78.74
  text "BOOT" at -103.79,1934.91 h60 r90
  text "RESET" at -103.79,1523.96 h60 r90
  text "FUSE" at 5465.8,1516.4 h78.74
  text "24V" at 5459.13,1437.84 h60
  text "STALL" at 3495.13,1359.2 h60 r90
  text "STALL" at 2280.29,1358.34 h60 r90
  text "FAULT" at 3416.14,1358.51 h60 r90
  text "FAULT" at 2199.3,1357.65 h60 r90
  text "USB TYPE C" at -99.97,807.43 h60 r90
  text "VBUS" at 391.27,791.2 h60
  text "OVR-CR" at 15.02,630.91 h60
  text "SLAVE CAN IN" at 4611.95,567.92 h100
  text "VBUS" at 12.7,506.29 h60
  text "3V3" at 12.7,381.13 h60
  text "STEPPER DRIVER - 2" at 3366.2,338.64 h100
  text "STEPPER DRIVER - 1" at 2149.36,337.78 h100
  text "5V0" at 12.59,257.28 h60
  text "B2" at 3428.1,253.87 h78.74
  text "B1" at 3631.78,253.87 h78.74
  text "A2" at 3826.09,253.87 h78.74
  text "A1" at 4029.77,253.87 h78.74
  text "B2" at 2211.26,253.01 h78.74
  text "B1" at 2414.94,253.01 h78.74
  text "A2" at 2609.25,253.01 h78.74
  text "A1" at 2812.93,253.01 h78.74
  text "5V0" at 721.62,-99.22 h60
Bottom Overlay:
  text "Rev-v2.0" at -100.66,2858.16 h80 r270
  text "STEPPER DRIVER" at 39.34,2588.24 h80 r270
Top Solder:
  region: 302.72,4049.67 302.72,3946.84 637.36,3946.84 637.36,4049.67
  region: -158.58,3950.37 -158.58,4172.86 -157.85,4173.6 64.65,4173.6 cw(c-0.74,4015.75) 170.12,4015.75 cw(c-0.74,4015.75) -0.74,3844.89 cw(c-0.74,4015.75)
  region: 65.38,-157.85 -157.11,-157.85 -157.85,-157.11 -157.85,65.38 cw(c0,0) 0,170.85 cw(c0,0) 170.85,0 cw(c0,0)
  region: 5524.8,-157.48 5747.3,-157.48 5748.03,-156.74 5748.03,65.75 ccw(c5590.18,0.37) 5590.18,171.22 ccw(c5590.18,0.37) 5419.33,0.37 ccw(c5590.18,0.37)
  region: 5747.66,3951.1 5747.66,4173.6 5746.93,4174.33 5524.43,4174.33 ccw(c5589.82,4016.48) 5418.96,4016.48 ccw(c5589.82,4016.48) 5589.82,3845.63 ccw(c5589.82,4016.48)
Bottom Solder:
  drawing of 194 lines, arcs and shapes, not listed
Board Outline:
  the board outline again, w10
Fabrication:
  drawing of 295 lines, arcs and shapes, not listed
  text "Layer" at 7239.67,5330.07 h60
  text "Name" at 7649.59,5330.07 h60
  text "Material" at 8579.33,5330.07 h60
  text "Thickness" at 9439.1,5330.07 h60
  text "Constant" at 10088.93,5330.07 h60
  text "Board Layer Stack" at 10658.79,5330.07 h60
  text "Top Overlay" at 7649.59,5210.07 h60
  text "Top Solder" at 7649.59,5090.07 h60
  text "Solder Resist" at 8579.33,5090.07 h60
  text "0.010mm" at 9439.1,5090.07 h60
  text "3.5" at 10088.93,5090.07 h60
  text "1" at 7239.67,4970.07 h60
  text "Top Layer" at 7649.59,4970.07 h60
  text "0.035mm" at 9439.1,4970.07 h60
  text "Dielectric 2" at 7649.59,4850.07 h60
  text "PP-006" at 8579.33,4850.07 h60
  text "0.203mm" at 9439.1,4850.07 h60
  text "4.4" at 10088.93,4850.07 h60
  text "2" at 7239.67,4730.07 h60
  text "Layer 1" at 7649.59,4730.07 h60
  text "CF-004" at 8579.33,4730.07 h60
  text "0.035mm" at 9439.1,4730.07 h60
  text "Dielectric 1" at 7649.59,4610.07 h60
  text "FR-4" at 8579.33,4610.07 h60
  text "1.030mm" at 9439.1,4610.07 h60
  text "4.6" at 10088.93,4610.07 h60
  text "3" at 7239.67,4490.07 h60
  text "Layer 2" at 7649.59,4490.07 h60
  text "CF-004" at 8579.33,4490.07 h60
  text "0.035mm" at 9439.1,4490.07 h60
  text "Dielectric 3" at 7649.59,4370.07 h60
  text "PP-006" at 8579.33,4370.07 h60
  text "0.203mm" at 9439.1,4370.07 h60
  text "4.4" at 10088.93,4370.07 h60
  text "4" at 7239.67,4250.07 h60
  text "Bottom Layer" at 7649.59,4250.07 h60
  text "0.035mm" at 9439.1,4250.07 h60
  text "Bottom Solder" at 7649.59,4130.07 h60
  text "Solder Resist" at 8579.33,4130.07 h60
  text "0.010mm" at 9439.1,4130.07 h60
  text "3.5" at 10088.93,4130.07 h60
  text "Bottom Overlay" at 7649.59,4010.07 h60
  text "Total board thickness:" at 7239.67,3890.07 h60
  text "1.596mm" at 9439.1,3890.07 h60